# Altium PCB PCB1.PcbDoc (part 2 of 2)
Units mm, origin at the board's own origin, x right, y up, seen from the top; angles counter-clockwise.
Board outline 313.69 x 191.13 mm, 2 copper layers (Top Layer, Bottom Layer), stack 1.535 mm thick; 91 components, 77 nets, 316 pads, 51 vias.
Unrouted connection lines stored in the file: 30.
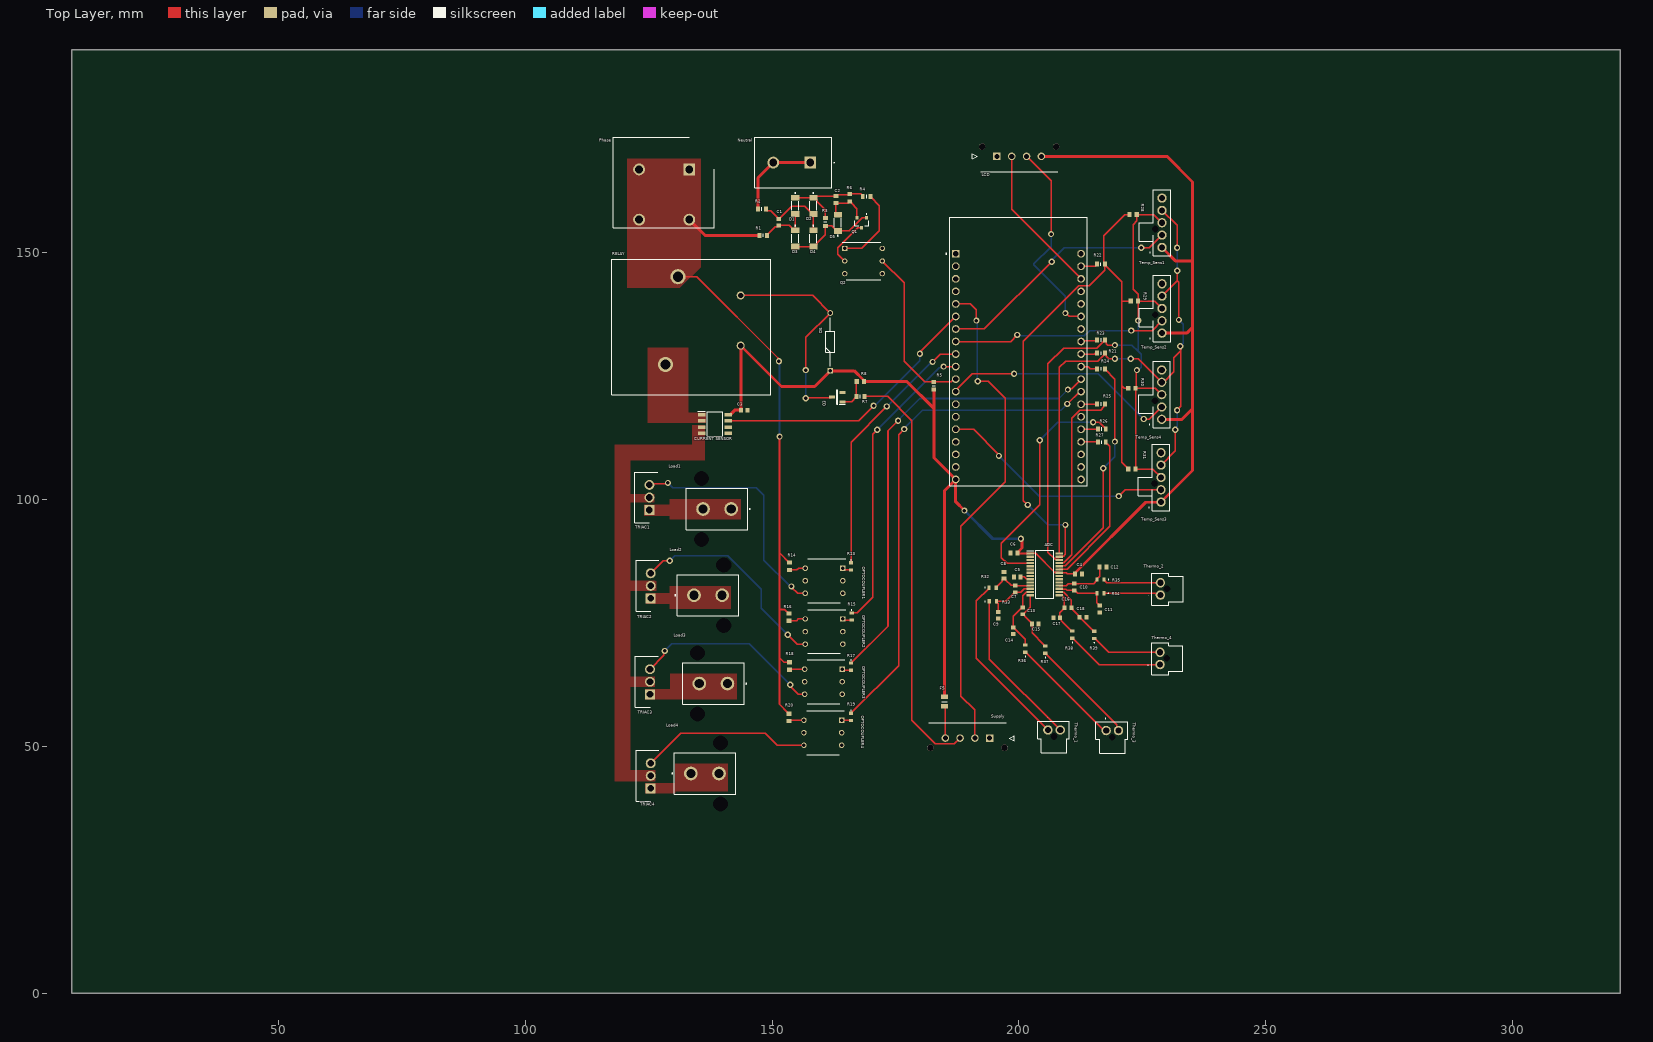
[diagram p0: Top Layer view]

## Polygon pours and split planes (outlines as drawn) (continued)
Load4 on Top Layer "LOAD4_L01_P053" (solid, pour order 53): 140.97,46.482 130.429,46.482 130.429,42.545 124.333,42.545 124.333,40.513 130.429,40.513 130.429,40.894 140.97,40.894
Load3 on Top Layer "LOAD3_L01_P052" (solid, pour order 52): 142.875,64.77 129.413,64.77 129.413,61.595 129.286,61.595 124.333,61.595 124.333,59.563 142.875,59.563
Load2 on Top Layer "LOAD2_L01_P051" (solid, pour order 51): 141.605,82.423 129.286,82.423 129.286,81.026 124.46,81.026 124.46,78.994 124.587,78.867 129.286,78.867 129.286,77.851 141.605,77.851
RELAY_OUT on Top Layer "RELAY_OUT_L01_P049" (solid, pour order 49): 132.969,130.81 132.969,117.729 133.096,117.602 136.525,117.602 136.525,115.57 124.841,115.57 124.841,130.81
Phase on Top Layer "PHASE_L01_P047" (solid, pour order 47): 131.318,142.875 135.509,147.066 135.509,169.037 120.65,169.037 120.65,142.875
Phase on Bottom Layer "PHASE_L02_P048" (solid, pour order 48): 135.509,147.066 135.509,169.037 120.65,169.037 120.65,142.875 131.318,142.875